# Altium PCB ide_podule-16bit_long.PcbDoc (part 1 of 2)
Units mm, origin at the board's own origin, x right, y up, seen from the top; angles counter-clockwise.
Board outline 101.85 x 160.01 mm, 2 copper layers (F.Cu, B.Cu), stack 1.571 mm thick; 35 components, 85 nets, 455 pads, 316 vias.
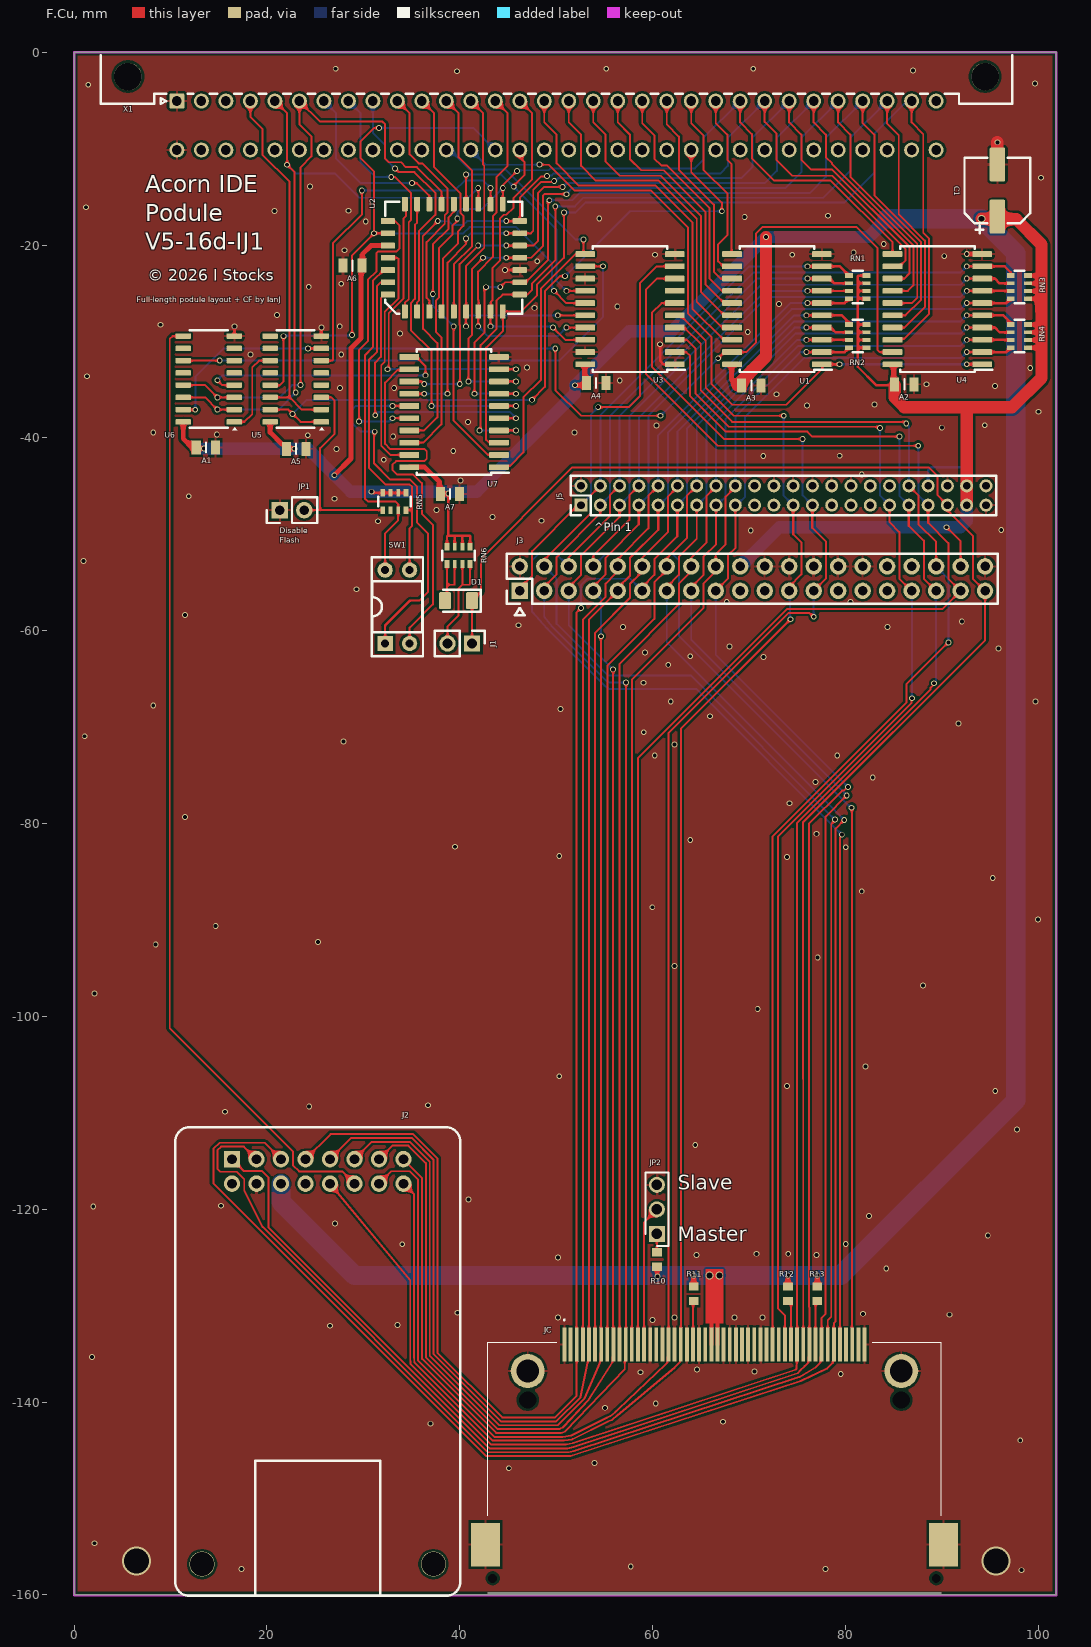
[diagram p0: F.Cu view]
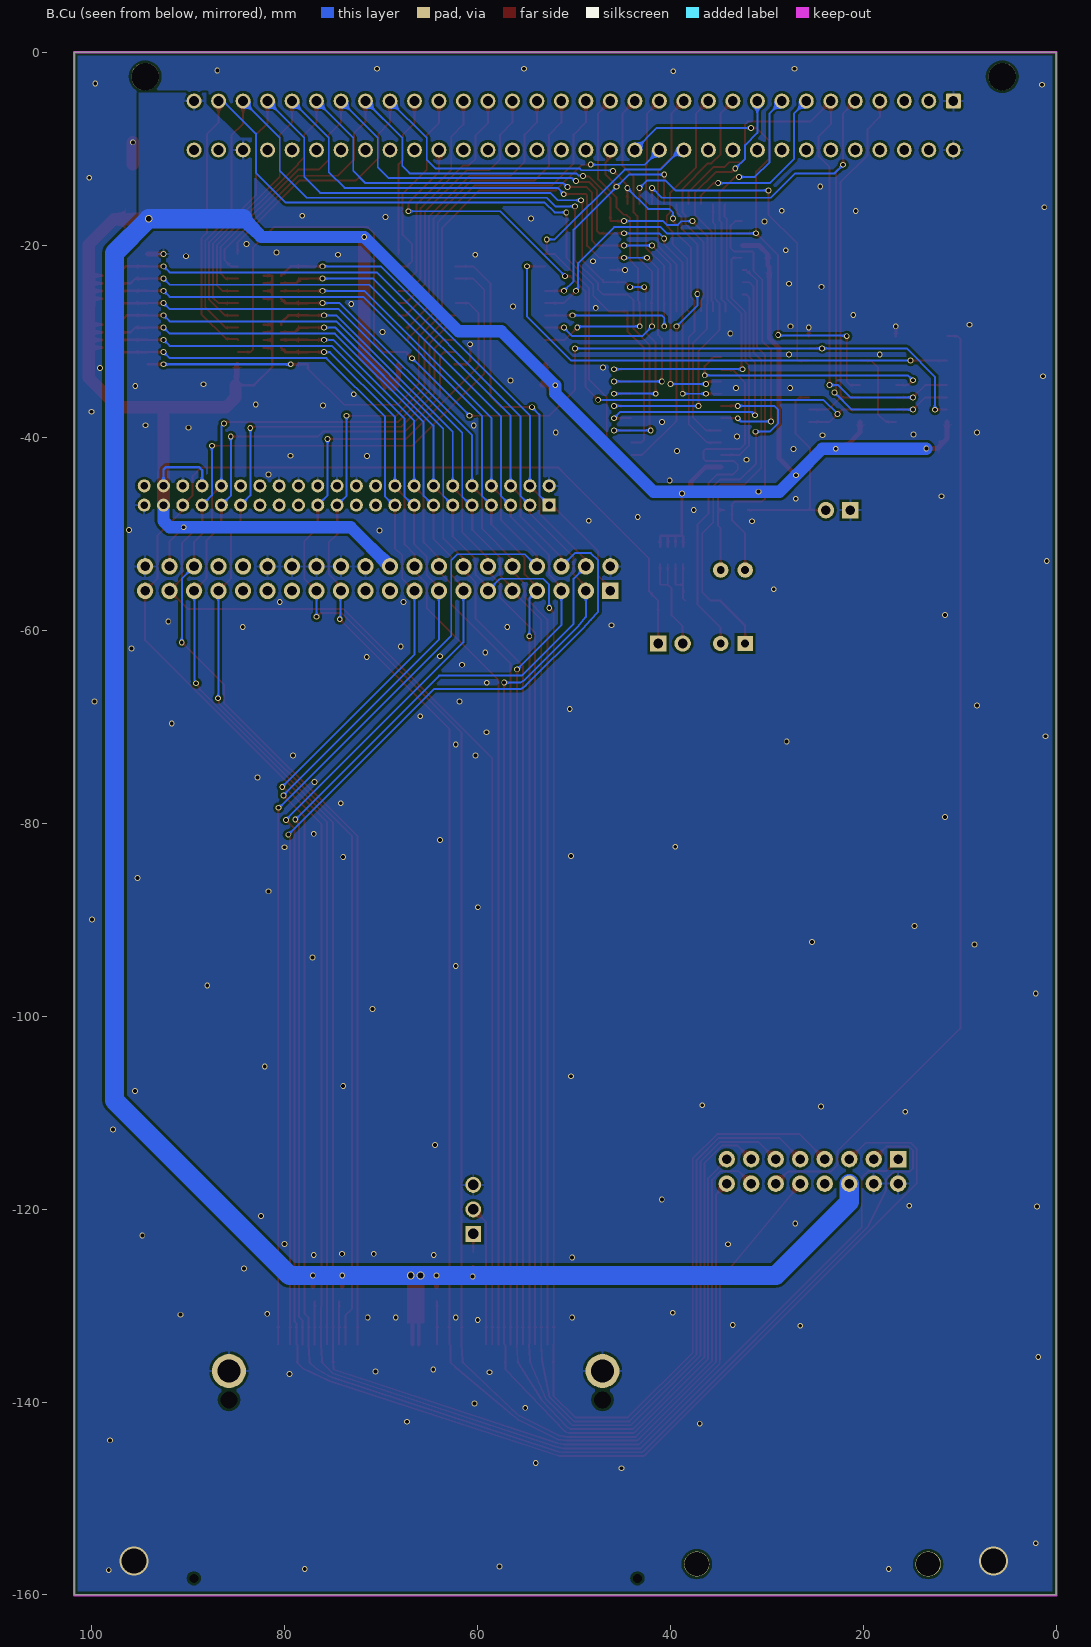
[diagram p1: B.Cu view, seen from below]

## Layer stack, top to bottom
F.Mask: solder mask 0.0102, Solder Resist, Dk 3.5
F.Cu: signal copper 0.0356
Dielectric 1: dielectric 1.5, FR-4, Dk 4.8
B.Cu: signal copper 0.0356
B.Mask: solder mask 0.0102, Solder Resist, Dk 3.5

## Board outline
0,-160 101.854,-160 101.854,0.012 0,0.012

## Design rules (kind name [scope] priority, off if disabled: settings)
Clearance [All] p1: gap=0.254 ignorepadtopadclearanceinfootprint=FALSE except(0.2: Arc-Arc Arc-Track Arc-SMDPad Arc-THPad Arc-Via Track-Track Track-SMDPad Track-THPad Track-Via SMDPad-SMDPad SMDPad-Fill SMDPad-Poly SMDPad-Region Fill-Fill Fill-Poly Fill-Region Poly-Poly Poly-Region Region-Region)
HoleSize [All] p1: absolutevalues=TRUE maxlimit=5 minlimit=0.025 maxpercent=80.000 minpercent=20.000
MinimumSolderMaskSliver [All] p1: minsoldermaskwidth=0
PolygonConnect [All] p1: connectstyle=Relief reliefconductorwidth=0.254 reliefentries=4 polygonreliefangle="90 Angle" airgapwidth=0.254
RoutingVias [All] p1: holewidth=0.711 width=1.27 viastyle="Through Hole" minholewidth=0.4 minwidth=0.6 maxholewidth=0.711 maxwidth=1.27
SilkToSilkClearance [All] p1: silktosilkclearance=0
SilkToSolderMaskClearance [IsPad] p1: minsilkscreentomaskgap=0 clearancetoexposedcopper=TRUE
SolderMaskExpansion [All] p1: expansion=0 istentingtop=FALSE
SupplyNets "Schematic Supply Nets_2" [InNet('GND')] p1: voltage=0.000
SupplyNets "Schematic Supply Nets" [InNet('VCC')] p2: voltage=0.000
Width [All] p1: maxlimit=10 minlimit=0.2 preferedwidth=0.2 minimp=50.000000 maximp=50.000000 favimp=50.000000
26 further rules are at their usual default settings.

## Components (designator, comment, footprint, x,y, rotation, side; value= is the part's Value field where it differs from the comment)
A1 "100n" RESC2012X50N 13.665,-41.021 r0 top
A2 "100n" RESC2012X50N 86.106,-34.442 r0 top
A3 "100n" RESC2012X50N 70.239,-34.562 r0 top
A4 "100n" RESC2012X50N 54.153,-34.324 r0 top
A5 "100n" RESC2012X50N 23.038,-41.131 r0 top
A6 "100n" RESC2012X50N 28.88,-22.149 r180 top
A7 "100n" RESC2012X50N 38.989,-45.835 r0 top
C1 "47uF 16V" CP_Elec_6.3x5.8 95.758,-14.351 r90 top
D1 "LED" LED_1206_3216Metric 39.881,-56.884 r180 top
J1 "CONN_01X02" PinHeader_1x02_P2.54mm_Vertical 41.275,-61.329 r270 top
J2 "Conn_02x08_Odd_Even" CH376-mod 34.163,-114.808 r180 top locked
J3 "CONN_02X20" PinHeader_2x20_P2.54mm_Vertical 46.228,-55.868 r90 top
J5 "CONN_02X22" PinHeader_2x22_P2.00mm_Vertical 52.578,-46.978 r90 top
JC "N7E50-Q516RB-40" N7E50Q516RB40 66.421,-136.779 r0 top locked
JP1 "Jumper_NO_Small" PinHeader_1x02_P2.54mm_Vertical 21.336,-47.5 r90 top
JP2 "3pin header" HDRV3W64P254_1X3_762X241X838P 60.452,-122.555 r90 top
R10 "1K" RESC1608X50N 60.452,-125.222 r270 top
R11 "1K" RESC1608X50N 64.262,-128.778 r90 top
R12 "1K" RESC1608X50N 74.041,-128.778 r90 top
R13 "1K" RESC1608X50N 77.089,-128.778 r90 top
RN1 "4K7" R_Array_Convex_4x0603 81.28,-24.372 r0 top
RN2 "4K7" R_Array_Convex_4x0603 81.28,-29.452 r0 top
RN3 "4K7" R_Array_Convex_4x0603 98.044,-24.372 r0 top
RN4 "4K7" R_Array_Convex_4x0603 98.044,-29.452 r0 top
RN5 "4K7" R_Array_Convex_4x0603 33.217,-46.608 r270 top
RN6 "680R" R_Array_Convex_4x0603 39.878,-52.185 r270 top
SW1 "SW_DIP_x02" DIP-4_W7.62mm_Socket 32.258,-61.329 r90 top
U1 "74HC245" SOIC-20W_7.5x12.8mm_P1.27mm 72.898,-26.658 r180 top
U2 "SST39SF010" PLCC-32_11.4x14.0mm_P1.27mm 39.391,-21.324 r90 top
U3 "74HC245" SOIC-20W_7.5x12.8mm_P1.27mm 57.658,-26.658 r180 top
U4 "74HC245" SOIC-20W_7.5x12.8mm_P1.27mm 89.535,-26.658 r180 top
U5 "74HC139" STC_SOP-16_3.9x9.9mm_P1.27mm 22.987,-33.897 r180 top
U6 "74HC139" STC_SOP-16_3.9x9.9mm_P1.27mm 13.97,-33.897 r180 top
U7 "74HC273" SOIC-20W_7.5x12.8mm_P1.27mm 39.419,-37.326 r180 top
X1 "DIN41612_02x32_AC" DIN41612_C_2x32_Male_Horizontal_THT 10.668,-5.068 r0 top

## Footprints (in the part's own frame and the unit in brackets; to place one, negate y for a bottom-side part, rotate by r counter-clockwise, add the part's x,y. Pads: shape width x height; smd on the part's side, far side on the other; paste and mask are expansions set on the pad)
CH376-mod [mm]
  rect 1.7x1.7 hole 1 paste-2539.97 mask+0: 1(17.78,0)
  round 1.7 hole 1 paste-2539.97 mask+0: 2(17.78,2.54) 3(15.24,0) 4(15.24,2.54) 5(12.7,0) 6(12.7,2.54) 7(10.16,0) 8(10.16,2.54) 9(7.62,0) 10(7.62,2.54) 11(5.08,0) 12(5.08,2.54) 13(2.54,0) 14(2.54,2.54) 15(0,0) 16(0,2.54)
  round 2.6 hole 2.5 paste-2539.97 mask+0: M(-3.11,42) M(20.89,42)
  silkscreen extent -5.91,-3.3 23.69,45.3
CP_Elec_6.3x5.8 [mm]
  rrect16% 3.5x1.6 smd mask+0: 1(-2.7,0) 2(2.7,0)
  silkscreen extent -4.44,-3.41 3.41,3.41
DIN41612_C_2x32_Male_Horizontal_THT [mm]
  rrect16% 1.55x1.55 hole 1 paste-2539.97 mask+0: a1(0,0)
  round 1.55 hole 1 paste-2539.97 mask+0: a2(2.54,0) a3(5.08,0) a4(7.62,0) a5(10.16,0) a6(12.7,0) a7(15.24,0) a8(17.78,0) a9(20.32,0) a10(22.86,0) a11(25.4,0) a12(27.94,0) a13(30.48,0) a14(33.02,0) a15(35.56,0) a16(38.1,0) a17(40.64,0) a18(43.18,0) a19(45.72,0) a20(48.26,0) a21(50.8,0) a22(53.34,0) a23(55.88,0) a24(58.42,0) a25(60.96,0) a26(63.5,0) a27(66.04,0) a28(68.58,0) a29(71.12,0) a30(73.66,0) a31(76.2,0) a32(78.74,0) c1(0,-5.08) c2(2.54,-5.08) c3(5.08,-5.08) c4(7.62,-5.08) c5(10.16,-5.08) c6(12.7,-5.08) c7(15.24,-5.08) c8(17.78,-5.08) c9(20.32,-5.08) c10(22.86,-5.08) c11(25.4,-5.08) c12(27.94,-5.08) c13(30.48,-5.08) c14(33.02,-5.08) c15(35.56,-5.08) c16(38.1,-5.08) c17(40.64,-5.08) c18(43.18,-5.08) c19(45.72,-5.08) c20(48.26,-5.08) c21(50.8,-5.08) c22(53.34,-5.08) c23(55.88,-5.08) c24(58.42,-5.08) c25(60.96,-5.08) c26(63.5,-5.08) c27(66.04,-5.08) c28(68.58,-5.08) c29(71.12,-5.08) c30(73.66,-5.08) c31(76.2,-5.08) c32(78.74,-5.08)
  round 2.85 hole 2.85 paste-2539.97 mask+0: Un1(-5.08,2.54) Un2(83.82,2.54)
  silkscreen extent -7.89,-0.3 86.63,4.74
DIP-4_W7.62mm_Socket [mm]
  rect 1.6x1.6 hole 0.8 paste-2539.97 mask+0: 1(0,0)
  rrect100% 1.6x1.6 hole 0.8 paste-2539.97 mask+0: 2(0,-2.54) 3(7.62,-2.54) 4(7.62,0)
  silkscreen extent -1.33,-3.93 8.95,1.39
HDRV3W64P254_1X3_762X241X838P [mm]
  rect 1.65x1.65 hole 1.1: 1(0,0)
  round 1.65 hole 1.1: 2(2.54,0) 3(5.08,0)
  silkscreen extent -1.27,-1.2 6.35,1.2, body extent -1.27,-1.2 6.35,1.2, height 8.38
LED_1206_3216Metric [mm]
  rrect20% 1.25x1.75 smd mask+0: 1(-1.4,0) 2(1.4,0)
  silkscreen extent -2.28,-1.13 1.6,1.13
N7E50Q516RB40 [mm]
  rect 0.4x3.5 smd: 1(-15.56,2.75) 2(-14.29,2.75) 3(-13.02,2.75) 4(-11.75,2.75) 5(-10.48,2.75) 6(-9.21,2.75) 7(-7.94,2.75) 8(-6.67,2.75) 9(-5.4,2.75) 10(-4.13,2.75) 11(-2.86,2.75) 12(-1.59,2.75) 13(-0.32,2.75) 14(0.95,2.75) 15(2.22,2.75) 16(3.49,2.75) 17(4.76,2.75) 18(6.03,2.75) 19(7.3,2.75) 20(8.57,2.75) 21(9.84,2.75) 22(11.11,2.75) 23(12.38,2.75) 24(13.65,2.75) 25(14.92,2.75) 26(-14.925,2.75) 27(-13.655,2.75) 28(-12.385,2.75) 29(-11.115,2.75) 30(-9.845,2.75) 31(-8.575,2.75) 32(-7.305,2.75) 33(-6.035,2.75) 34(-4.765,2.75) 35(-3.495,2.75) 36(-2.225,2.75) 37(-0.955,2.75) 38(0.315,2.75) 39(1.585,2.75) 40(2.855,2.75) 41(4.125,2.75) 42(5.395,2.75) 43(6.665,2.75) 44(7.935,2.75) 45(9.205,2.75) 46(10.475,2.75) 47(11.745,2.75) 48(13.015,2.75) 49(14.285,2.75) 50(15.56,2.75)
  round 3.525 hole 2.35: MH1(-19.37,0) MH2(19.37,0)
  round 0.89 hole 1.78 unplated: MH3(-19.37,-3) MH4(19.37,-3)
  round 0.465 hole 0.93 unplated: MH5(-23,-21.5) MH6(23,-21.5)
  rect 3x4.5 smd: MP1(-23.75,-18) MP2(23.75,-18)
  silkscreen extent -23.5,-23 23.5,5.35, body extent -24.95,-23 24.95,4.46, height 4.75
PinHeader_1x02_P2.54mm_Vertical [mm]
  rect 1.7x1.7 hole 1 paste-2539.97 mask+0: 1(0,0)
  rrect100% 1.7x1.7 hole 1 paste-2539.97 mask+0: 2(0,-2.54)
  silkscreen extent -1.33,-3.87 1.33,1.33
PinHeader_2x20_P2.54mm_Vertical [mm]
  rect 1.7x1.7 hole 1 paste-2539.97 mask+0: 1(0,0)
  rrect100% 1.7x1.7 hole 1 paste-2539.97 mask+0: 2(2.54,0) 3(0,-2.54) 4(2.54,-2.54) 5(0,-5.08) 6(2.54,-5.08) 7(0,-7.62) 8(2.54,-7.62) 9(0,-10.16) 10(2.54,-10.16) 11(0,-12.7) 12(2.54,-12.7) 13(0,-15.24) 14(2.54,-15.24) 15(0,-17.78) 16(2.54,-17.78) 17(0,-20.32) 18(2.54,-20.32) 19(0,-22.86) 20(2.54,-22.86) 21(0,-25.4) 22(2.54,-25.4) 23(0,-27.94) 24(2.54,-27.94) 25(0,-30.48) 26(2.54,-30.48) 27(0,-33.02) 28(2.54,-33.02) 29(0,-35.56) 30(2.54,-35.56) 31(0,-38.1) 32(2.54,-38.1) 33(0,-40.64) 34(2.54,-40.64) 35(0,-43.18) 36(2.54,-43.18) 37(0,-45.72) 38(2.54,-45.72) 39(0,-48.26) 40(2.54,-48.26)
  silkscreen extent -1.33,-49.59 3.87,1.33
PinHeader_2x22_P2.00mm_Vertical [mm]
  rect 1.35x1.35 hole 0.8 paste-2539.97 mask+0: 1(0,0)
  rrect100% 1.35x1.35 hole 0.8 paste-2539.97 mask+0: 2(2,0) 3(0,-2) 4(2,-2) 5(0,-4) 6(2,-4) 7(0,-6) 8(2,-6) 9(0,-8) 10(2,-8) 11(0,-10) 12(2,-10) 13(0,-12) 14(2,-12) 15(0,-14) 16(2,-14) 17(0,-16) 18(2,-16) 19(0,-18) 20(2,-18) 21(0,-20) 22(2,-20) 23(0,-22) 24(2,-22) 25(0,-24) 26(2,-24) 27(0,-26) 28(2,-26) 29(0,-28) 30(2,-28) 31(0,-30) 32(2,-30) 33(0,-32) 34(2,-32) 35(0,-34) 36(2,-34) 37(0,-36) 38(2,-36) 39(0,-38) 40(2,-38) 41(0,-40) 42(2,-40) 43(0,-42) 44(2,-42)
  silkscreen extent -1.06,-43.06 3.06,1.06
PLCC-32_11.4x14.0mm_P1.27mm [mm]
  rrect25% 0.6x1.475 smd mask+0: 1(0,6.837) 2(-1.27,6.837) 3(-2.54,6.837) 4(-3.81,6.837) 14(-3.81,-6.837) 15(-2.54,-6.837) 16(-1.27,-6.837) 17(0,-6.837) 18(1.27,-6.837) 19(2.54,-6.837) 20(3.81,-6.837) 30(3.81,6.837) 31(2.54,6.837) 32(1.27,6.837)
  rrect25% 1.475x0.6 smd mask+0: 5(-5.563,5.08) 6(-5.563,3.81) 7(-5.563,2.54) 8(-5.563,1.27) 9(-5.563,0) 10(-5.563,-1.27) 11(-5.563,-2.54) 12(-5.563,-3.81) 13(-5.563,-5.08) 21(5.563,-5.08) 22(5.563,-3.81) 23(5.563,-2.54) 24(5.563,-1.27) 25(5.563,0) 26(5.563,1.27) 27(5.563,2.54) 28(5.563,3.81) 29(5.563,5.08)
  silkscreen extent -5.82,-7.09 5.82,7.09
R_Array_Convex_4x0603 [mm]
  rect 0.8x0.5 smd mask+0: 1(-0.9,1.2) 4(-0.9,-1.2) 5(0.9,-1.2) 8(0.9,1.2)
  rect 0.8x0.4 smd mask+0: 2(-0.9,0.4) 3(-0.9,-0.4) 6(0.9,-0.4) 7(0.9,0.4)
  silkscreen extent -0.5,-1.68 0.5,1.68
RESC1608X50N [mm]
  rect 0.85x1 smd: 1(-0.75,0) 2(0.75,0)
  body extent -0.5,-0.25 0.5,0.25, height 0.35
RESC2012X50N [mm]
  rect 0.95x1.45 smd: 1(-1,0) 2(1,0)
  silkscreen extent 0,-0.53 0,0.53, body extent -1.02,-0.63 1.02,0.63, height 0.5
SOIC-20W_7.5x12.8mm_P1.27mm [mm]
  rrect25% 2.05x0.6 smd mask+0: 1(-4.65,5.715) 2(-4.65,4.445) 3(-4.65,3.175) 4(-4.65,1.905) 5(-4.65,0.635) 6(-4.65,-0.635) 7(-4.65,-1.905) 8(-4.65,-3.175) 9(-4.65,-4.445) 10(-4.65,-5.715) 11(4.65,-5.715) 12(4.65,-4.445) 13(4.65,-3.175) 14(4.65,-1.905) 15(4.65,-0.635) 16(4.65,0.635) 17(4.65,1.905) 18(4.65,3.175) 19(4.65,4.445) 20(4.65,5.715)
  silkscreen extent -5.68,-6.51 3.86,6.51
STC_SOP-16_3.9x9.9mm_P1.27mm [mm]
  rrect25% 1.6x0.55 smd mask+0: 1(-2.65,4.445) 2(-2.65,3.175) 3(-2.65,1.905) 4(-2.65,0.635) 5(-2.65,-0.635) 6(-2.65,-1.905) 7(-2.65,-3.175) 8(-2.65,-4.445) 9(2.65,-4.445) 10(2.65,-3.175) 11(2.65,-1.905) 12(2.65,-0.635) 13(2.65,0.635) 14(2.65,1.905) 15(2.65,3.175) 16(2.65,4.445)
  silkscreen extent -2.94,-5.06 1.95,5.31

## Part data
A1 A2 A3 A4 A5 A6 A7: library part C_Small
C1: library part CP
J1: library part CONN_01X02-conn-podule_ide_ics_clone_v3-rescue
J3: library part CONN_02X20-conn-podule_ide_ics_clone_v3-rescue
J5: library part CONN_02X22-conn-podule_ide_ics_clone_v3-rescue
JC: "Connector", Manufacturer_Name=3M, Mouser Part Number=517-N7E50-Q516RB-40, Datasheet Link=http://multimedia.3m.com/mws/media/223587O/3mtm-cf-card-hdr-compactflashtm-type-ii-surfacemount-ts2082.pdf, Height=4.65mm, Manufacturer_Part_Number=N7E50-Q516RB-40, Mouser Price/Stock=https://www.mouser.co.uk/ProductDetail/3M-Electronic-Solutions-Division/N7E50-Q516RB-40?qs=U4pz39agNJAOgdzscodSQg%3D%3D
JP2: library part TSW-103-07-S-S-LL, "Connector", Manufacturer_Name=SAMTEC, Mouser Part Number=200-TSW10307SSLL, Arrow Part Number=TSW-103-07-S-S-LL, Arrow Price/Stock=https://www.arrow.com/en/products/tsw-103-07-s-s-ll/samtec.html?utm_currency=USD&region=nac, Datasheet Link=http://suddendocs.samtec.com/catalog_english/tsw_th.pdf, Height=8.38mm, Manufacturer_Part_Number=TSW-103-07-S-S-LL, Mouser Price/Stock=https://www.mouser.co.uk/ProductDetail/Samtec/TSW-103-07-S-S-LL?qs=rU5fayqh%252BE2qFj1BrU5SIQ%3D%3D
R10 R11 R12 R13: library part CRCW06031K00FKEI, "Resistor", Manufacturer_Name=Vishay, Mouser Part Number=71-CRCW06031K00FKEI, Datasheet Link=http://www.vishay.com/docs/20035/dcrcwe3.pdf, Height=0.5mm, Manufacturer_Part_Number=CRCW06031K00FKEI, Mouser Price/Stock=https://www.mouser.co.uk/ProductDetail/Vishay-Dale/CRCW06031K00FKEI?qs=%252B6g0mu59x7LmDUigK4duvw%3D%3D
RN1 RN2 RN3 RN4 RN5 RN6: library part R_Pack04
U1 U3 U4: library part 74HC245-podule_ide_ics_clone_v3-rescue
U2: library part SST39SF040-memory-podule_ide_ics_clone_v3-rescue
U5 U6: library part 74LS139
U7: library part 74AHC273

## Via types
v1: diameter 0.6, hole 0.4, F.Cu to B.Cu, tented both sides, 311 vias
v2: diameter 0.8, hole 0.6, F.Cu to B.Cu, tented both sides, 3 vias
v3: diameter 3, hole 2.6, F.Cu to B.Cu, tented both sides, 2 vias

## Nets (pads, with @x,y where several pads share a name; then routed paths per layer and width w, separated by ;. In a path a pad name is that pad's centre, name@x,y a point inside that pad or via, vN(x,y) a via of type N, cw(c..) or ccw(c..) an arc to the next point about the centre after c; other vN are vias at no path point)
BCS0: J3.37 J5.37 JC.7 U3.8 | length 161.9
  F.Cu w0.2: JC.7@58.481,-134.029 58.481,-73.218 73.952,-57.747 90.069,-57.747 J3.37@91.948,-55.868 90.678,-54.598 90.678,-50.915 88.578,-48.815 ; U3.8@62.358,-23.483 60.452,-23.483 59.309,-24.626 59.309,-33.362 66.763,-40.816 v1(87.559,-40.816)
  F.Cu w0.254: 88.578,-48.815 J5.37@88.578,-46.978
  B.Cu w0.2: v1(87.559,-40.816) 87.559,-45.959 J5.37@88.578,-46.978
BD0: U2.13 U4.18 U7.3 X1.a31 | length 100.5
  F.Cu w0.2: U7.3@44.069,-40.501 43.044,-40.501 42.744,-40.201 42.744,-30.65 44.471,-28.924 U2.13@44.471,-26.887 46.38,-26.887 48.006,-25.261 48.006,-24.13 50.8,-21.336 v1(50.8,-16.625) ; U4.18@84.835,-29.833 84.935,-29.733 86.091,-29.733 88.646,-27.178 88.646,-19.304 88.075,-18.732 88.075,-8.497 86.868,-7.291 X1.a31@86.868,-5.068
  B.Cu w0.2: v1(50.8,-16.625) 52.018,-16.625 53.034,-15.609 79.883,-15.609 82.988,-12.504 82.988,-8.452 86.114,-5.326 86.61,-5.326 X1.a31@86.868,-5.068
BD1: U2.14 U4.17 U7.4 X1.a30 | length 101.8
  F.Cu w0.2: v1(42.037,-39.231) 42.164,-39.104 42.164,-30.371 43.83,-28.705 43.83,-25.754 44.45,-25.134 U2.14@46.228,-25.134 46.99,-25.134 47.498,-24.626 47.498,-23.991 49.911,-21.578 v1(49.911,-15.99) ; U7.4@44.069,-39.231 v1(45.847,-39.231) ; X1.a30@84.328,-5.068 84.328,-7.418 85.534,-8.624 85.534,-16.828 88.246,-19.539 88.246,-26.435 86.118,-28.563 U4.17@84.835,-28.563
  B.Cu w0.2: v1(42.037,-39.231) v1(45.847,-39.231) ; v1(49.911,-15.99) 51.943,-15.99 52.832,-15.101 77.724,-15.101 80.518,-12.307 80.518,-8.878 X1.a30@84.328,-5.068
BD2: U2.15 U4.16 U7.7 X1.a29 | length 97.4
  F.Cu w0.2: v1(41.529,-35.421) 41.529,-30.119 42.56,-29.088 42.56,-24.535 v1(42.723,-24.372) ; U7.7@44.069,-35.421 v1(45.847,-35.421) ; v1(44.196,-24.372) 44.704,-23.864 U2.15@46.228,-23.864 46.863,-23.864 49.149,-21.578 49.149,-15.497 v1(49.291,-15.355) ; X1.a29@81.788,-5.068 81.788,-7.354 82.995,-8.561 82.995,-14.853 87.846,-19.705 87.846,-25.657 86.21,-27.293 U4.16@84.835,-27.293
  B.Cu w0.2: v1(41.529,-35.421) v1(45.847,-35.421) ; v1(42.723,-24.372) v1(44.196,-24.372) ; v1(49.291,-15.355) 51.689,-15.355 52.451,-14.593 76.327,-14.593 77.978,-12.942 77.978,-8.878 X1.a29@81.788,-5.068
BD3: U2.17 U4.15 U7.8 X1.a28 | length 95.6
  F.Cu w0.2: v1(40.894,-34.151) 40.894,-29.706 41.275,-29.325 41.275,-22.467 v1(42.418,-21.324) ; U7.8@44.069,-34.151 v1(45.847,-34.151) ; v1(44.831,-21.324) U2.17@46.228,-21.324 47.408,-21.324 48.641,-20.091 48.641,-14.847 48.768,-14.72 51.048,-14.72 v1(51.06,-14.731) ; X1.a28@79.248,-5.068 79.248,-7.291 80.518,-8.561 80.518,-12.942 87.446,-19.87 87.446,-25.445 86.868,-26.023 U4.15@84.835,-26.023
  B.Cu w0.2: v1(40.894,-34.151) v1(45.847,-34.151) ; v1(42.418,-21.324) v1(44.831,-21.324) ; v1(51.06,-14.731) 51.06,-14.714 51.689,-14.085 73.787,-14.085 75.438,-12.434 75.438,-8.878 X1.a28@79.248,-5.068
BD4: U2.18 U4.14 U7.13 X1.a27 | length 92.3
  F.Cu w0.2: U7.13@34.769,-34.151 36.02,-34.151 36.286,-34.417 v1(36.322,-34.417) ; v1(40.005,-34.417) 40.005,-28.309 39.99,-28.295 39.99,-21.974 v1(41.91,-20.054) ; v1(44.831,-20.054) U2.18@46.228,-20.054 47.625,-20.054 48.133,-19.546 48.133,-14.593 48.756,-13.97 v1(50.673,-13.97) ; X1.a27@76.708,-5.068 76.708,-7.291 77.978,-8.561 77.978,-10.91 78.613,-11.545 78.613,-11.603 87.046,-20.036 87.046,-24.194 86.487,-24.753 U4.14@84.835,-24.753
  B.Cu w0.2: v1(36.322,-34.417) v1(40.005,-34.417) ; v1(41.91,-20.054) v1(44.831,-20.054) ; v1(50.673,-13.97) 50.736,-13.97 51.129,-13.577 71.628,-13.577 72.898,-12.307 72.898,-8.878 X1.a27@76.708,-5.068
BD5: U2.19 U4.13 U7.14 X1.a26 | length 90.9
  F.Cu w0.2: U7.14@34.769,-35.421 34.775,-35.427 36.316,-35.427 v1(36.322,-35.433) ; v1(38.735,-35.421) 38.735,-21.832 40.646,-19.921 40.646,-19.329 v1(40.654,-19.321) ; v1(44.831,-18.784) U2.19@46.228,-18.784 47.371,-18.784 47.625,-18.53 47.625,-14.27 48.448,-13.447 49.715,-13.447 v1(49.791,-13.37) ; X1.a26@74.168,-5.068 74.168,-7.291 75.438,-8.561 75.438,-11.164 76.454,-12.18 78.624,-12.18 86.646,-20.202 86.646,-22.943 86.106,-23.483 U4.13@84.835,-23.483
  B.Cu w0.2: v1(36.322,-35.433) 36.328,-35.427 38.729,-35.427 v1(38.735,-35.421) ; v1(40.654,-19.321) 40.654,-19.278 41.148,-18.784 v1(44.831,-18.784) ; v1(49.791,-13.37) 49.9,-13.37 50.201,-13.069 69.215,-13.069 70.358,-11.926 70.358,-8.878 X1.a26@74.168,-5.068
BD6: U2.20 U4.12 U7.17 X1.a25 | length 94.3
  F.Cu w0.2: U7.17@34.769,-39.231 36.322,-39.231 37.684,-37.869 37.684,-30.179 36.195,-28.69 36.195,-26.123 36.161,-26.089 36.161,-19.072 v1(37.719,-17.514) ; v1(44.831,-17.514) U2.20@46.228,-17.514 46.228,-15.101 48.419,-12.91 49.001,-12.91 v1(49.064,-12.847) ; X1.a25@71.628,-5.068 71.628,-7.227 72.834,-8.434 72.834,-11.164 74.486,-12.815 78.613,-12.815 86.233,-20.435 86.233,-21.578 85.598,-22.213 U4.12@84.835,-22.213
  B.Cu w0.2: v1(37.719,-17.514) 37.738,-17.533 38.862,-17.533 39.239,-17.91 40.371,-17.91 40.767,-17.514 v1(44.831,-17.514) ; v1(49.064,-12.847) 49.141,-12.77 49.555,-12.77 49.764,-12.561 67.056,-12.561 67.818,-11.799 67.818,-8.878 X1.a25@71.628,-5.068
BD7: U2.21 U4.11 U7.18 X1.a24 | length 90.4
  F.Cu w0.2: U7.18@34.769,-40.501 36.195,-40.501 38.1,-38.596 38.1,-29.579 37.52,-29 37.52,-25.769 37.861,-25.429 37.861,-20.293 39.243,-18.911 39.243,-18.022 39.751,-17.514 v1(39.751,-17.26) ; U2.21@44.471,-15.762 44.471,-13.799 v1(45.948,-12.322) ; X1.a24@69.088,-5.068 69.088,-7.291 70.294,-8.497 70.294,-10.986 72.632,-13.323 78.474,-13.323 84.885,-19.734 U4.11@84.885,-20.943
  B.Cu w0.2: v1(39.751,-17.26) 39.751,-16.625 40.132,-16.244 42.326,-16.244 v1(44.471,-14.1) ; v1(45.948,-12.322) 46.023,-12.247 49.24,-12.247 49.433,-12.053 64.389,-12.053 65.278,-11.164 65.278,-8.878 X1.a24@69.088,-5.068
BD8: U1.11 X1.a23 | length 16.6
  F.Cu w0.2: X1.a23@66.548,-5.068 66.548,-7.354 67.754,-8.561 67.754,-11.164 68.198,-11.608 U1.11@68.198,-20.943
BD9: U1.12 X1.a22 | length 20.2
  F.Cu w0.2: X1.a22@64.008,-5.068 64.008,-7.354 65.278,-8.624 65.278,-12.18 67.783,-14.685 67.783,-18.946 66.802,-19.927 66.802,-21.705 67.31,-22.213 U1.12@68.198,-22.213
BD10: U1.13 X1.a21 | length 21.9
  F.Cu w0.2: X1.a21@61.468,-5.068 61.468,-7.481 62.738,-8.751 62.738,-12.18 66.358,-15.8 66.358,-22.785 67.056,-23.483 U1.13@68.198,-23.483
BD11: U1.14 X1.a20 | length 24.5
  F.Cu w0.2: X1.a20@58.928,-5.068 58.928,-7.354 60.198,-8.624 60.198,-11.037 60.896,-11.736 61.468,-11.736 65.913,-16.181 65.913,-23.483 67.183,-24.753 U1.14@68.198,-24.753
BD12: U1.15 X1.a19 | length 27.7
  F.Cu w0.2: X1.a19@56.388,-5.068 56.388,-7.291 57.658,-8.561 57.658,-11.101 58.801,-12.244 61.151,-12.244 65.468,-16.562 65.468,-24.055 67.437,-26.023 U1.15@68.198,-26.023
BD13: U1.16 X1.a18 | length 31.1
  F.Cu w0.2: X1.a18@53.848,-5.068 53.848,-7.291 55.118,-8.561 55.118,-11.355 56.578,-12.815 60.833,-12.815 65.024,-17.006 65.024,-24.88 67.437,-27.293 U1.16@68.198,-27.293
BD14: U1.17 X1.a17 | length 34.1
  F.Cu w0.2: X1.a17@51.308,-5.068 51.308,-7.291 52.578,-8.561 52.578,-11.799 54.102,-13.323 60.642,-13.323 64.579,-17.26 64.579,-25.896 67.246,-28.563 U1.17@67.373,-28.563
BD15: U1.18 X1.a16 | length 37.3
  F.Cu w0.2: X1.a16@48.768,-5.068 48.768,-7.291 50.038,-8.561 50.038,-11.545 52.324,-13.831 60.325,-13.831 64.135,-17.641 64.135,-26.595 67.373,-29.833 U1.18@67.501,-29.833
BLA2: J2.10 J3.35 J5.35 JC.20 U3.2 | length 200.1
  F.Cu w0.2: J2.10@26.543,-117.348 34.869,-127.382 34.869,-135.411 34.885,-135.948 34.887,-136.028 43.264,-144.405 51.007,-144.405 51.726,-144.267 51.928,-144.198 74.844,-136.642 74.932,-136.555 74.936,-136.479 74.985,-135.679 JC.20@74.991,-134.029 74.991,-79.932 88.841,-66.082 88.841,-65.907 89.194,-65.554 v1(89.194,-65.445) ; U3.2@62.358,-31.103 63.5,-31.103 63.896,-31.499 63.896,-35.68 67.574,-39.358 76.061,-39.358 76.569,-39.866 85.583,-39.866 v1(85.598,-39.851) ; 86.578,-49.101 88.138,-50.661 88.138,-54.598 J3.35@89.408,-55.868
  F.Cu w0.254: 86.578,-49.101 J5.35@86.578,-46.978
  B.Cu w0.2: v1(85.598,-39.851) 85.598,-45.998 J5.35@86.578,-46.978 ; v1(89.194,-65.445) 89.194,-65.337 89.382,-65.15 89.382,-55.894 J3.35@89.408,-55.868
BLA3: J3.33 J5.33 JC.19 U3.3 | length 130.2
  F.Cu w0.2: U3.3@62.358,-29.833 63.563,-29.833 64.45,-30.719 64.45,-35.375 67.925,-38.85 83.449,-38.85 v1(83.576,-38.977) ; JC.19@73.721,-134.029 73.721,-130.998 73.025,-130.302 73.025,-81.332 86.842,-67.515 86.842,-67.082 v1(86.918,-67.006) ; J5.33@84.578,-46.978 84.578,-48.752 85.598,-49.772 85.598,-54.598 J3.33@86.868,-55.868
  B.Cu w0.2: v1(83.576,-38.977) 83.576,-45.976 J5.33@84.578,-46.978 ; J3.33@86.868,-55.868 86.893,-55.893 86.893,-66.98 v1(86.918,-67.006)
BLA4: J3.36 J5.36 JC.18 U3.4 | length 135.8
  F.Cu w0.2: U3.4@62.358,-28.563 63.309,-28.563 64.994,-30.247 64.994,-35.086 68.25,-38.342 86.126,-38.342 v1(86.304,-38.52) ; JC.18@72.451,-134.029 72.451,-81.34 86.318,-67.473 86.318,-65.574 v1(90.678,-61.214) ; J5.36@86.578,-44.978 86.582,-44.978 87.566,-45.962 87.566,-48.947 89.408,-50.788 J3.36@89.408,-53.328
  B.Cu w0.2: v1(86.304,-38.52) 86.578,-38.794 J5.36@86.578,-44.978 ; J3.36@89.408,-53.328 90.678,-54.598 v1(90.678,-61.214)
BUSYLED: D1.1 J1.1 J3.39 J5.39 JC.45 | length 160.8
  F.Cu w0.2: J1.1@41.275,-61.329 41.275,-56.89 D1.1@41.281,-56.884 42.215,-55.95 42.215,-52.515 50.754,-43.976 51.664,-43.066 88.646,-43.066 89.553,-43.973 89.553,-45.953 J5.39@90.578,-46.978 90.578,-47.513 93.218,-50.153 93.218,-54.598 J3.39@94.488,-55.868 94.488,-61 75.6,-79.888 75.6,-106.481 75.626,-106.507 JC.45@75.626,-134.029
C0: U2.25 U7.2 | length 30.4
  F.Cu w0.2: v1(37.211,-25.078) 37.211,-19.927 38.843,-18.295 38.843,-17.122 39.391,-16.574 U2.25@39.391,-15.762 ; v1(39.37,-28.436) 39.37,-38.215 42.926,-41.771 U7.2@44.069,-41.771
  B.Cu w0.2: v1(37.211,-25.078) 37.211,-26.277 v1(39.37,-28.436)
C1: U2.4 U7.5 | length 30.1
  F.Cu w0.2: v1(31.231,-37.661) 31.231,-32.194 31.819,-31.605 31.819,-25.516 31.915,-25.419 31.915,-25.334 32.115,-25.134 U2.4@32.553,-25.134 ; U7.5@44.069,-37.961 v1(45.847,-37.961)
  B.Cu w0.2: v1(31.231,-37.661) 31.581,-37.311 45.197,-37.311 v1(45.847,-37.961)
C2: U2.28 U7.6 | length 32.7
  F.Cu w0.2: U2.28@35.581,-15.762 35.581,-17.671 35.357,-17.895 35.357,-25.591 34.925,-26.023 34.925,-28.817 37.084,-30.976 v1(37.084,-36.703) ; U7.6@44.069,-36.691 v1(45.847,-36.691)
  B.Cu w0.2: v1(37.084,-36.703) 37.09,-36.697 45.841,-36.697 v1(45.847,-36.691)
C3: U2.29 U7.9 | length 33.1
  F.Cu w0.2: v1(32.512,-32.881) 32.639,-32.754 32.639,-27.085 34.163,-25.561 34.163,-17.26 34.417,-17.006 34.417,-15.868 U2.29@34.311,-15.762 ; U7.9@44.069,-32.881 v1(45.847,-32.881)
  B.Cu w0.2: v1(32.512,-32.881) v1(45.847,-32.881)
C4: SW1.2 U7.12 | length 40.9
  F.Cu w0.2: U7.12@34.769,-32.881 34.689,-32.961 33.561,-32.961 32.258,-34.265 32.258,-40.628 32.766,-41.136 36.322,-41.136 36.576,-41.39 36.576,-42.152 36.322,-42.406 33.401,-42.406 33.02,-42.787 33.02,-43.295 33.528,-43.803 35.179,-43.803 36.068,-44.692 36.068,-47.867 37.211,-49.01 37.211,-57.265 34.798,-59.678 SW1.2@34.798,-61.329
C5: SW1.1 U7.15 | length 38.1
  F.Cu w0.2: v1(31.181,-39.358) 31.115,-39.424 31.115,-42.66 32.766,-44.311 34.836,-44.311 35.56,-45.035 35.56,-48.756 36.703,-49.899 36.703,-55.995 35.814,-56.884 34.852,-56.884 ; SW1.1@32.258,-61.329 32.258,-59.478 ; v1(33.02,-36.691) U7.15@34.769,-36.691
  F.Cu w0.254: 32.258,-59.478 34.852,-56.884
  B.Cu w0.2: v1(31.181,-39.358) 29.718,-39.358 28.829,-38.469 28.829,-37.072 29.21,-36.691 v1(33.02,-36.691)
C6: U2.30 U7.16 | length 29.9
  F.Cu w0.2: v1(29.562,-38.296) 29.562,-30.878 30.48,-29.96 30.48,-23.61 31.369,-22.721 31.369,-20.816 31.496,-20.689 33.401,-20.689 33.763,-20.327 33.763,-17.987 33.29,-17.514 U2.30@32.553,-17.514 ; v1(33.02,-37.961) 33.401,-37.961 U7.16@34.769,-37.961
  B.Cu w0.2: v1(29.562,-38.296) 32.685,-38.296 v1(33.02,-37.961)
C7: U2.1 U7.19 | length 24.6
  F.Cu w0.2: U2.1@32.553,-21.324 33.528,-21.324 33.655,-21.451 33.655,-25.503 32.219,-26.939 32.219,-32.127 31.858,-32.489 31.858,-40.833 32.796,-41.771 U7.19@34.769,-41.771
CF_CS1: JC.32 JP2.2 | length 14.6
  F.Cu w0.2: JC.32@59.116,-134.029 59.116,-121.351 JP2.2@60.452,-120.015
CF_WE: JC.36 R11.1 | length 4.5
  F.Cu w0.2: JC.36@64.196,-134.029 64.196,-129.594 R11.1@64.262,-129.528
CLK1: U6.4 U7.11 | length 26.8
  F.Cu w0.2: v1(14.859,-34.024) 15.367,-34.532 U6.4@16.62,-34.532 ; U7.11@34.769,-31.611 35.502,-31.611 36.449,-32.558 v1(36.449,-33.516)
  B.Cu w0.2: v1(14.859,-34.024) 15.367,-33.516 v1(36.449,-33.516)
CS0: U3.12 U6.11 | length 52.5
  F.Cu w0.2: U6.11@11.32,-31.992 v1(15.113,-31.992) ; U3.12@53.008,-22.213 53.014,-22.207 54.857,-22.207 v1(54.864,-22.2)
  B.Cu w0.2: v1(15.113,-31.992) 50.304,-31.992 54.864,-27.432 v1(54.864,-22.2)
D0: J2.1 J3.17 J5.17 JC.21 RN4.4 U4.2 | length 214.3
  F.Cu w0.2: J2.1@16.383,-114.808 17.625,-116.05 19.499,-116.05 20.101,-116.652 20.159,-116.71 20.159,-121.886 42.909,-144.636 43.099,-144.805 51.172,-144.805 51.792,-144.668 75.038,-137.014 75.328,-136.724 75.766,-136.263 76.126,-135.903 76.161,-135.679 JC.21@76.261,-134.029 76.261,-130.164 76.208,-130.111 76.208,-80.042 79.662,-76.588 79.804,-76.588 80.192,-76.2 v1(80.264,-76.2) ; J3.17@66.548,-55.868 67.818,-54.598 67.818,-52.185 68.578,-51.425 J5.17@68.578,-46.978 ; v1(92.583,-31.103) U4.2@94.185,-31.103 U4.2@94.235,-31.103
  F.Cu w0.254: U4.2@94.235,-31.103 96.693,-31.103 RN4.4@97.144,-30.652
  B.Cu w0.2: J3.17@66.548,-55.868 66.548,-62.484 v1(80.264,-76.2) ; J5.17@68.578,-46.978 68.707,-46.978 69.596,-46.089 69.596,-37.834 75.692,-31.738 91.948,-31.738 v1(92.583,-31.103)
D1: J2.3 J3.15 J5.15 JC.22 RN4.3 U4.3 | length 224.6
  F.Cu w0.2: J2.3@18.923,-114.808 17.618,-113.503 15.261,-113.503 14.859,-113.905 14.859,-115.79 15.182,-116.112 16.856,-116.112 17.648,-116.905 17.648,-118.039 19.545,-121.837 42.744,-145.036 42.786,-145.078 42.933,-145.205 51.338,-145.205 51.858,-145.068 75.203,-137.414 76.856,-136.444 77.396,-135.903 77.431,-135.679 JC.22@77.531,-134.029 77.531,-131.257 77.943,-130.845 77.943,-79.283 v1(80.137,-77.089) ; J3.15@64.008,-55.868 64.008,-55.499 65.278,-54.229 65.278,-52.312 66.578,-51.012 J5.15@66.578,-46.978 ; v1(92.583,-29.833) U4.3@94.235,-29.833
  F.Cu w0.254: U4.3@94.235,-29.833 97.125,-29.833 RN4.3@97.144,-29.852
  B.Cu w0.2: J3.15@64.008,-55.868 64.008,-60.92 80.137,-77.049 v1(80.137,-77.089) ; J5.15@66.675,-46.978 67.564,-46.089 67.564,-38.025 75.12,-30.468 91.948,-30.468 v1(92.583,-29.833)
D2: J2.5 J3.13 J5.13 JC.23 RN4.2 U4.4 | length 232.5
  F.Cu w0.2: J2.5@21.463,-114.808 19.758,-113.103 15.398,-113.103 15.095,-113.103 14.459,-113.739 14.459,-114.042 14.459,-117.329 42.559,-145.429 42.608,-145.478 42.767,-145.605 51.504,-145.605 51.924,-145.468 75.369,-137.814 78.105,-136.525 78.138,-136.492 78.701,-135.929 78.701,-134.1 JC.23@78.801,-134.029 78.801,-131.825 78.982,-131.644 78.982,-80.53 v1(79.883,-79.629) ; J3.13@61.468,-55.868 61.468,-55.487 62.738,-54.217 62.738,-52.312 64.578,-50.472 J5.13@64.578,-46.978 ; v1(92.583,-28.563) U4.4@94.235,-28.563
  F.Cu w0.254: U4.4@94.235,-28.563 95.504,-28.563 95.993,-29.052 RN4.2@97.144,-29.052
  B.Cu w0.2: J3.13@61.468,-55.868 61.468,-61.214 v1(79.883,-79.629) ; J5.13@64.578,-46.978 64.643,-46.978 65.596,-46.026 65.596,-38.406 74.803,-29.198 91.948,-29.198 v1(92.583,-28.563)
D3: J2.7 J3.11 J5.11 JC.2 RN4.1 U4.5 | length 203.2
  F.Cu w0.2: J2.7@24.003,-114.808 26.6,-112.211 34.889,-112.211 35.168,-112.211 37.687,-114.73 37.687,-115.009 37.687,-134.868 44.366,-141.546 44.424,-141.605 49.847,-141.605 52.131,-139.321 JC.2@52.131,-134.029 JC.2@52.121,-134.019 ; JC.2@52.107,-134.005 52.107,-58.129 v1(52.578,-57.658) ; J3.11@58.928,-55.868 58.928,-55.487 60.198,-54.217 60.198,-52.566 62.578,-50.186 ; v1(92.583,-27.293) U4.5@94.235,-27.293
  F.Cu w0.254: 62.578,-50.186 J5.11@62.578,-46.978 ; U4.5@94.235,-27.293 96.393,-27.293 97.144,-28.044 RN4.1@97.144,-28.252
  B.Cu w0.2: v1(52.578,-57.658) 52.578,-55.245 53.213,-54.61 57.67,-54.61 57.744,-54.684 J3.11@58.928,-55.868 ; J5.11@62.578,-46.978 62.611,-46.978 63.563,-46.026 63.563,-39.041 74.676,-27.928 91.948,-27.928 v1(92.583,-27.293)
D4: J2.9 J3.9 J5.9 JC.3 RN3.4 U4.6 | length 196.8
  F.Cu w0.2: J2.9@26.543,-114.808 28.74,-112.611 35.002,-112.611 37.287,-114.896 37.287,-115.174 37.287,-135.034 44.258,-142.005 50.013,-142.005 52.531,-139.487 53.209,-136.18 53.266,-135.903 53.301,-135.679 JC.3@53.401,-134.029 53.401,-58.855 J3.9@56.388,-55.868 56.388,-55.551 57.658,-54.281 57.658,-52.454 60.578,-49.534 ; v1(92.583,-26.023) U4.6@94.185,-26.023 U4.6@94.235,-26.023
  F.Cu w0.254: 60.578,-49.534 J5.9@60.578,-46.978 ; U4.6@94.235,-26.023 96.693,-26.023 RN3.4@97.144,-25.572
  B.Cu w0.2: J5.9@60.578,-46.978 60.706,-46.978 61.595,-46.089 61.595,-39.485 74.422,-26.658 91.948,-26.658 v1(92.583,-26.023)
D5: J2.11 J3.7 J5.7 JC.4 RN3.3 U4.7 | length 197.6
  F.Cu w0.2: J2.11@29.083,-114.808 30.88,-113.011 34.558,-113.011 34.837,-113.011 36.887,-115.061 36.887,-115.34 36.887,-135.199 44.093,-142.405 50.178,-142.405 52.931,-139.652 54.536,-135.903 54.571,-135.679 JC.4@54.671,-134.029 54.641,-133.999 54.641,-60.584 v1(54.636,-60.579) ; J3.7@53.848,-55.868 53.848,-55.424 55.118,-54.154 55.118,-52.439 58.578,-48.979 ; v1(92.583,-24.753) U4.7@94.235,-24.753
  F.Cu w0.254: 58.578,-48.979 J5.7@58.578,-46.978 ; U4.7@94.235,-24.753 97.125,-24.753 RN3.3@97.144,-24.772
  B.Cu w0.2: J3.7@53.848,-55.868 54.636,-56.656 v1(54.636,-60.579) ; J5.7@58.578,-46.978 59.563,-45.993 59.563,-37.707 71.882,-25.388 91.948,-25.388 v1(92.583,-24.753)